# Altium PCB HSS_2026_PCB.PcbDoc (part 2 of 3)
Units mil, origin at the board's own origin, x right, y up, seen from the top; angles counter-clockwise.
Board outline 3937.01 x 3937.01 mil, 4 copper layers (SIG_1/POW, GND, PWR, SIG_2/GND), stack 22.334 mil thick; 289 components, 169 nets, 827 pads, 358 vias.
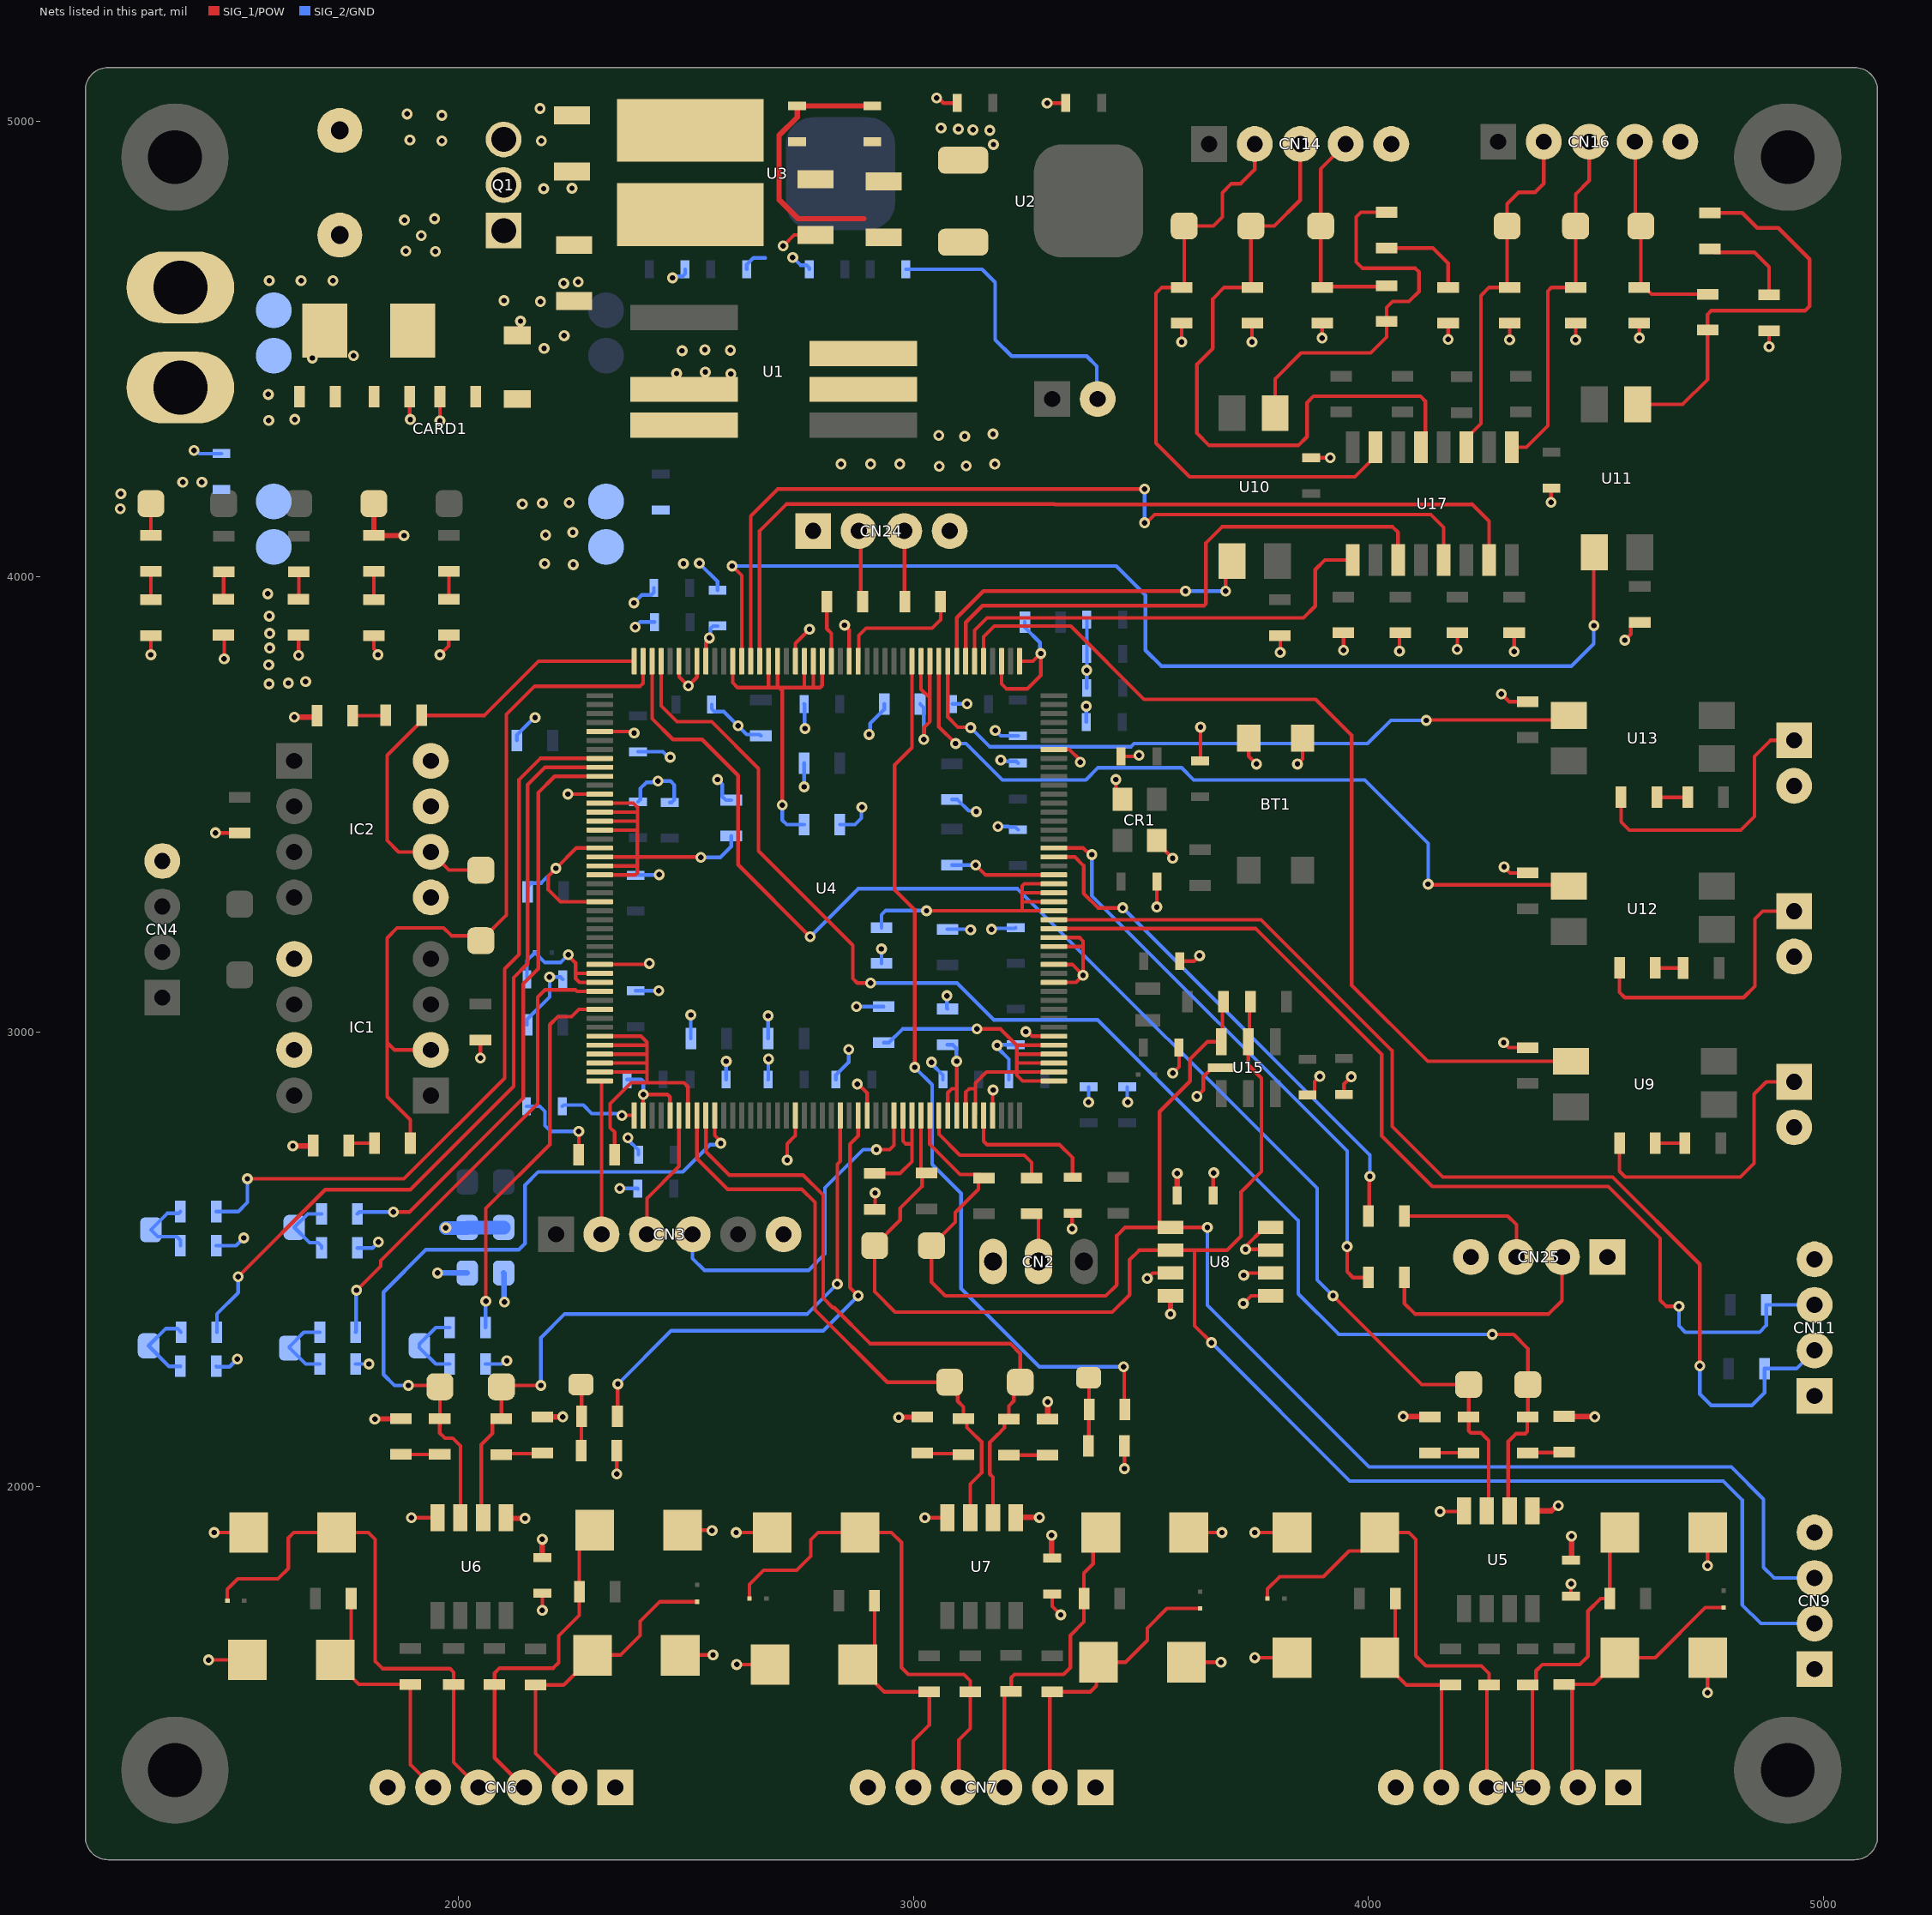
[diagram p4: the nets of this part, all layers, seen from the top]

## Via types
v1: diameter 24, hole 12, SIG_1/POW to SIG_2/GND, tented both sides, 358 vias

## Nets (pads, with @x,y where several pads share a name; then routed paths per layer and width w, separated by ;. In a path a pad name is that pad's centre, name@x,y a point inside that pad or via, vN(x,y) a via of type N, cw(c..) or ccw(c..) an arc to the next point about the centre after c; other vN are vias at no path point) (continued)
+5V_I: C4.1 C5.2 C6.2 C58.2 C59.2 C60.2 C61.2 CN5.1 CN6.1 CN7.1 CN9.1 CN11.1 CN24.1 CN25.1 D7.1 D8.1 D13.1 D14.1 D19.1 D20.1 D25.1 D26.1 IC2.8 P25.1 P26.1 R6.2 T4.1 U1.7 U2.1 U5.1 U6.1 U7.1 U8.8 | length 1663.7
  SIG_1/POW w12: v1(1637,2749) 1680.26,2749 D7.1@1681.26,2750 ; v1(1640,3691) 1686.31,3691 D8.1@1689.84,3694.53 ; T4.1@1815,4160 R6.2@1815,4090 v1(1881,4090) ; v1(1817,2149) 1817.58,2149.58 1873.95,2149.58 D20.1@1874.53,2150.16 ; U6.1@2105,1932.25 2106.25,1931 v1(2147,1931) ; C59.2@2185,1845 v1(2185,1885) ; D19.1@2185,2153.74 2185.13,2153.87 2229.87,2153.87 v1(2230,2154) ; 2891,4786 2747,4786 2705,4828 2705,4969 2745,5009 C5.2@2745,5033.74 C6.2@2910,5033.74 ; v1(2968,2153) 2968.37,2153.37 3019.63,2153.37 D26.1@3020,2153.74 ; U7.1@3225,1932.25 3225.75,1933 v1(3277,1933) ; D25.1@3295,2148.74 v1(3295,2187) ; v1(3304,1894) 3304,1844.74 C60.2@3305,1843.74 ; v1(3565,2380) U8.8@3565,2420 ; C61.2@3580,2640 v1(3580,2689) ; v1(4076,2155) 4076.63,2154.37 4134.37,2154.37 D14.1@4135,2153.74 ; U5.1@4360,1947.25 4402,1947.25 4413.75,1959 v1(4417,1959) ; D13.1@4429.53,2155.16 4430.11,2154.58 4496.42,2154.58 v1(4497,2154) ; C58.2@4445,1838.74 4446,1839.74 v1(4446,1892)
  SIG_2/GND w12: v1(1955,2470) P25.1@2020,2470 ; P26.1@2100,2470 2101,2469 2101,2407 v1(2102,2406)
  other v1: 3057,4242 3116,4243 3179,4247 3113,4308 3056,4310 3175,4313
+24V: C2.2 C15.2 CARD1.3 CARD1.4 I1.1 Q1.3 R3.2 T1.1 ZD1.2 | length 70
  SIG_1/POW w8: R3.2@1325,4090 T1.1@1325,4160
  other v1: 1258,4149 1259,4182 1395,4207 1437,4207 2189,4501 2233,4529 2137,4561 2181,4604 2101,4606 1964,4957 2183,4957 1894,4959 1964,5013 1888,5016 2180,5028
A4_GPIO1: U4.49 U9.1 | length 2071.5
  SIG_1/POW w8: U4.49@3154.49,3813.82 3154.49,3867.49 3178,3891 3346,3891 3507,3730 3884,3730 3963,3651 3963,3102 4130,2935 U9.1@4445,2935
A5_GPIO2: U4.50 U17.1 | length 1008.9
  SIG_1/POW w8: U4.50@3134.8,3813.82 3134.8,3881.8 3162,3909 3857,3909 3883,3935 3883,4015 3904,4036 U17.1@3965,4036
A6_GPIO3: U4.51 U17.3 | length 1266.2
  SIG_1/POW w8: U4.51@3115.12,3813.82 3115.29,3813.99 3115.29,3899.29 3152,3936 3638.31,3936 3643,3940.69 3643,4074 3678,4109 4053,4109 4065,4097 U17.3@4065,4036
A7_TIM14_CH1: U4.52 U10.1 | length 782.2
  SIG_1/POW w8: U4.52@3095.43,3813.82 3095.43,3909.43 3154,3968 v1(3598,3968) ; v1(3686,3968) 3686,4020 U10.1@3700,4034
  SIG_2/GND w8: v1(3598,3968) v1(3686,3968)
A13_DEBUG_JTMS-SWDIO: CN3.2 U4.132 | length 339.7
  SIG_1/POW w8: U4.132@2311.18,2891.77 2313.49,2891.77 2315,2890.26 CN3.2@2315,2555
A14_DEBUG_JTCK-SWCLK: CN3.3 U4.138 | length 290.3
  SIG_1/POW w8: CN3.3@2415,2555 2415,2634 2485.2,2704.2 U4.138@2485.2,2816.18
B2_SPI3_MOSI: R43.1 U4.57 | length 1977.5
  SIG_1/POW w8: U4.57@2997.01,3813.82 2997.01,3624.01 2959,3586 2959,3312 3003,3268 v1(3003,2922) ; v1(3462,2264) 3463.5,2262.5 3463.5,2171.5 R43.1@3465,2170
  SIG_2/GND w8: v1(3003,2922) 3041.16,2883.84 3041.16,2708.61 3105,2644.77 3105,2436 3277,2264 v1(3462,2264)
B3_DEBUG_JTDO-SWO: CN3.4 U4.162 | length 770.6
  SIG_1/POW w8: v1(2919,2741) 2948,2741 2957.64,2750.64 U4.162@2957.64,2816.18
  SIG_2/GND w8: CN3.4@2515,2555 2515,2502 2541,2476 2770,2476 2806,2512 2806,2657 2890,2741 v1(2919,2741)
B6_I2C1_SCL: CN9.2 R10.1 R73.1 T6.1 U4.165 U8.6 U15.5 | length 3863.2
  SIG_1/POW w8: U4.165@3016.69,2816.18 3016.69,2697.55 R10.1@3024.5,2689.74 ; R10.1@3025.62,2686.36 R10.1@3029,2689.74 3026.81,2689.74 3019,2681.93 3019,2660 2971,2612 2971,2586 T6.1@2915,2530 2915,2429 2960,2384 3437,2384 3475,2422 3475,2499 3496,2520 U8.6@3565,2520 3618,2520 ; v1(3655,2317) 3618,2354 3618,2520 ; R73.1@3741,3066 3738.5,3063.5 3738.5,2980.59 U15.5@3736,2978.09 3736,2927 3765,2898 3765,2693 3720,2648 3720,2551 3689,2520 3618,2520
  SIG_2/GND w8: v1(3655,2317) 3959,2013 4779.31,2013 4821,1971.31 4821,1741 4862,1700 CN9.2@4980,1700
B7_I2C1_SDA: CN9.3 R11.1 R74.1 T7.1 U4.166 U8.5 U15.6 | length 3652.9
  SIG_1/POW w8: U4.166@3036.38,2816.18 3036.38,2752.62 3102.45,2686.55 3147.19,2686.55 R11.1@3155,2678.74 3150.81,2678.74 3143,2670.93 3143,2654 3092,2603 3092,2582 T7.1@3040,2530 3040,2450 3070,2420 3423,2420 3447,2444 3447,2552 3465,2570 U8.5@3551.76,2570 ; v1(3646,2570) U8.5@3565,2570 U8.5@3551.76,2570 ; R74.1@3681,3066 3678.97,3063.97 3678.97,2980.11 U15.6@3676.94,2978.09 3646.09,2978.09 3608,2940 3608,2891.43 3541,2824.43 3541,2580.76 U8.5@3551.76,2570
  SIG_2/GND w8: v1(3646,2570) 3646,2399 4001,2044 4797,2044 4868,1973 4868,1823 4891,1800 CN9.3@4980,1800
B12_UART5_RX: R37.2 T10.1 U4.85 U5.2 | length 3217.6
  SIG_1/POW w8: U4.85@2445.83,3813.82 2445.83,3716.17 2481,3681 2557,3681 2660,3578 2660,3397 2867,3190 2867,3117 2877,3107 v1(2906,3107) ; v1(4272,2335) 4319,2335 4350,2304 T10.1@4350,2225 R37.2@4350,2153.74 4349,2152.74 4349,2121.69 4344.31,2117 4324,2117 4307,2100 4307,1950.25 U5.2@4310,1947.25
  SIG_2/GND w8: v1(2906,3107) 3096,3107 3177,3026 3405,3026 3846,2585 3846,2424 3935,2335 v1(4272,2335)
B13_UART5_TX: R38.2 T11.1 U4.86 U5.3 | length 3156.4
  SIG_1/POW w8: U4.86@2426.14,3813.82 2426.14,3687.86 2472,3642 2536,3642 2615,3563 2615,3367 v1(2773.5,3208.5) ; v1(3922,2420) 4117,2225 T11.1@4220,2225 R38.2@4220,2153.74 4220,2123.69 4224.69,2119 4247,2119 4264,2102 4264,1951.25 U5.3@4260,1947.25
  SIG_2/GND w8: v1(2773.5,3208.5) 2879,3314 3229,3314 3887,2656 3887,2455 v1(3922,2420)
B14_USART1_TX: IC1.2 R29.2 T8.1 U4.87 | length 1698.8
  SIG_1/POW w8: R29.2@1895,2755 1895,2806.46 1844,2857.46 1844,2976 ; IC1.2@1940,2960 1860,2960 1844,2976 ; U4.87@2406.46,3813.82 2406.28,3813.65 2406.28,3765.28 2400,3759 2168,3759 2106,3697 2106,3256 T8.1@2050,3200 2039.24,3210.76 1985.24,3210.76 1968,3228 1866,3228 1844,3206 1844,2976
B15_USART1_RX: IC2.6 R39.2 T13.1 U4.88 | length 1055.4
  SIG_1/POW w8: T13.1@2050,3355 1980,3355 IC2.6@1940,3395 1869,3395 1844,3420 1844,3607.19 1920,3683.19 R39.2@1920,3695 2058,3695 2176.82,3813.82 U4.88@2386.77,3813.82
BOOT0: R9.1 U4.167 | length 305.1
  SIG_1/POW w8: U4.167@3056.06,2816.18 3056.24,2816.01 3056.24,2774.76 3102,2729 3244,2729 3260,2713 R9.1@3260,2678.74
C4_GPIO4: U4.53 U13.1 | length 1542.3
  SIG_1/POW w8: U4.53@3075.75,3813.82 3075.75,3691.25 3098,3669 3125,3669 v1(3126,3668) ; v1(4127,3684) 4128,3685 4430,3685 U13.1@4440,3695
  SIG_2/GND w8: v1(3126,3668) 3167.84,3626.16 3478.39,3626.16 3485.23,3633 3998,3633 4049,3684 v1(4127,3684)
C5_GPIO5: U4.54 U12.1 | length 1748.1
  SIG_1/POW w8: U4.54@3056.06,3813.82 3056.06,3669.94 v1(3093,3633) ; v1(4131,3324) 4132.07,3322.93 4437.07,3322.93 U12.1@4440,3320
  SIG_2/GND w8: v1(3093,3633) 3116,3633 3196,3553 3379,3553 3406,3580 3589,3580 3616,3553 3992,3553 4131.33,3413.67 4131.33,3324.33 v1(4131,3324)
C6_TIM3_CH1: R130.1 U4.122 | length 1045.9
  SIG_1/POW w8: v1(1777,2432) 1830,2485 1830,2497 2175,2842 2175,3076 2191,3092 2257.54,3092 2260.92,3088.62 U4.122@2311.18,3088.62
  SIG_2/GND w8: R130.1@1775,2340 1776,2341 1776,2431 v1(1777,2432)
C8_TIM3_CH3: R128.1 U4.124 | length 847.8
  SIG_1/POW w8: v1(2061,2408) 2061,2612 2201.5,2752.5 2201.5,3015.5 2219,3033 2249.15,3033 2265.4,3049.25 U4.124@2311.18,3049.25
  SIG_2/GND w8: R128.1@2060,2350 2060.5,2350.5 2060.5,2407.5 v1(2061,2408)
C10_SPI3_SCK: R60.2 T17.1 U4.140 U7.3 | length 1329.3
  SIG_1/POW w8: U4.140@2524.57,2816.18 2524.57,2721.43 2592,2654 2755,2654 2784,2625 2784,2389 2943,2230 T17.1@3080,2230 3097.52,2212.48 3097.52,2188.47 3110,2175.99 R60.2@3110,2150 3117.82,2142.19 3117.82,2130.88 3137.7,2111 3138,2111 3150,2099 3150,2031.14 3125,2006.14 U7.3@3125,1932.25
C11_SPI3_MISO: R59.2 T16.1 U4.141 U7.2 | length 1479.3
  SIG_1/POW w8: U4.141@2544.25,2816.18 2544.25,2736.75 2596,2685 2758,2685 2802,2641 2802,2415 2823,2394 2826,2394 2905,2315 3213,2315 3235,2293 T16.1@3235,2230 3220.61,2215.61 3220.61,2188.47 3210,2177.86 R59.2@3210,2148.74 3207.73,2148.74 3199.92,2140.93 3199.92,2129.62 3184.3,2114 3184,2114 3168,2098 3168,2028.38 3175,2021.38 U7.2@3175,1932.25
C12_SPI6_SCK: R56.2 T15.1 U4.142 U6.3 | length 1650.9
  SIG_1/POW w8: v1(1891,2223) 1957,2223 T15.1@1960,2220 1960,2150.63 R56.2@1959.53,2150.16 1959.53,2118.47 1971,2107 1988,2107 2005,2090 U6.3@2005,1932.25 ; U4.142@2563.94,2816.18 2563.94,2772.39 2577,2759.33 v1(2577,2755)
  SIG_2/GND w8: v1(1891,2223) 1860,2223 1836,2247 1836,2428 1929,2521 2133,2521 2147,2535 2147,2663 2176,2692 2493.67,2692 2553.61,2751.94 2573.94,2751.94 v1(2577,2755)
D13_TIM4_CH2: R138.1 U4.96 | length 1650.8
  SIG_1/POW w8: v1(1537,2677) 1881,2677 2102,2898 2102,3138 2134,3170 2134,3554 2180.43,3600.43 U4.96@2311.18,3600.43
  SIG_2/GND w8: R138.1@1468.74,2605 1517,2605 1537,2625 v1(1537,2677)
D14_TIM4_CH3: R129.1 U4.97 | length 1769.3
  SIG_1/POW w8: v1(1517,2462) 1708,2653 1895,2653 2122,2880 2122,3119 2152.5,3149.5 2152.5,3542.5 2190.75,3580.75 U4.97@2311.18,3580.75
  SIG_2/GND w8: R129.1@1470,2340 1470,2380 1517,2427 v1(1517,2462)
D15_TIM4_CH4: R136.1 U4.98 | length 1304.3
  SIG_1/POW w8: v1(1858,2604) 1893,2604 2143,2854 2143,3105 2176,3138 2176,3525 2212.06,3561.06 U4.98@2311.18,3561.06
  SIG_2/GND w8: R136.1@1778.74,2600 1782.74,2604 v1(1858,2604)
E12_GPIO6: U4.74 U17.7 | length 2015.5
  SIG_1/POW w8: U4.74@2662.36,3813.82 2662.36,4100.36 2721,4159 3309.95,4159 3310.53,4158.42 4225.42,4158.42 4226.69,4159.69 4265,4121.37 U17.7@4265,4036
E13_GPIO7: U4.75 U17.5 | length 2030.8
  SIG_1/POW w8: U4.75@2642.68,3813.82 2642.68,4132.68 2702,4192 v1(3507.95,4192) ; v1(3508,4118) 3512.33,4118 3530.33,4136 4137,4136 4165,4108 U17.5@4165,4036
  SIG_2/GND w8: v1(3508,4118) v1(3507.95,4192)
E14_TIM1_CH4: U4.76 U11.1 | length 2494.6
  SIG_1/POW w8: v1(2602,4023) 2622.99,4002.01 U4.76@2622.99,3813.82 ; v1(4495,3892) 4495,4052 U11.1@4496,4053
  SIG_2/GND w8: v1(2602,4023) 3446,4023 3510,3959 3510,3838 3545,3803 4446,3803 4495,3852 v1(4495,3892)
F0_I2C2_SDA: CN11.3 R148.1 U4.18 | length 2299.4
  SIG_1/POW w8: U4.18@3308.82,3226.42 3752.58,3226.42 4029,2950 4029,2771 4140,2660 4527,2660 4641,2546 4641,2410 4654,2397 v1(4682,2397)
  SIG_2/GND w8: v1(4682,2397) 4682,2354 4696,2340 4859,2340 4873.74,2354.74 R148.1@4873.74,2400 CN11.3@4980,2400
F1_I2C2_SCL: CN11.2 R147.1 U4.19 | length 2458.3
  SIG_1/POW w8: U4.19@3308.82,3246.1 3763.9,3246.1 4052,2958 4052,2792 4163,2681 4536,2681 4728,2489 v1(4728,2266)
  SIG_2/GND w8: v1(4728,2266) 4728,2204 4752.69,2179.31 4842.31,2179.31 4870,2207 R147.1@4870,2260 4940,2260 CN11.2@4980,2300
F6_UART7_RX: R146.1 U4.26 | length 1136.6
  SIG_1/POW w8: U4.26@3308.82,3383.9 3355.1,3383.9 3374.1,3364.9 3374.1,3303.9 3406,3272 3459.9,3272 v1(3460,3272.1) ; R146.1@4000,2595 4001.5,2596.5 4001.5,2680.5 v1(4003,2682)
  SIG_2/GND w8: v1(3460,3272.1) 4003,2729.1 v1(4003,2682)
F7_UART7_TX: R143.1 U4.27 | length 1290
  SIG_1/POW w8: U4.27@3308.82,3403.58 3373.09,3403.58 3387.67,3389 v1(3392,3389) ; v1(3953,2528) 3953,2473 3966,2460 R143.1@4000,2460
  SIG_2/GND w8: v1(3392,3389) 3392,3299 3953,2738 v1(3953,2528)
G0_UART9_RX: R145.1 U4.63 | length 291.1
  SIG_1/POW w8: U4.63@2878.9,3813.82 2880.41,3815.33 2880.41,3870.41 2896.26,3886.26 3041.26,3886.26 3060,3905 R145.1@3060,3945
G1_UART9_TX: R142.1 U4.66 | length 135.3
  SIG_1/POW w8: R142.1@2810,3945 2810,3885 2819.84,3875.16 U4.66@2819.84,3813.82
G12_SPI6_MISO: R55.2 T14.1 U4.156 U6.2 | length 1580.6
  SIG_1/POW w8: U6.2@2055,1932.25 2051,1936.25 2051,2093 2075.38,2117.38 2075.38,2142.19 2083.19,2150 R55.2@2095,2150 T14.1@2095,2220 2098,2223 v1(2182,2223) ; v1(2833,2446) 2833,2709 2839.53,2715.53 U4.156@2839.53,2816.18
  SIG_2/GND w8: v1(2182,2223) 2182,2328 2234,2380 2767,2380 v1(2833,2446)
G14_SPI6_MOSI: R41.1 U4.158 | length 1090.8
  SIG_1/POW w8: R41.1@2350,2155 2350.5,2155.5 2350.5,2225.5 v1(2351,2226) ; U4.158@2878.9,2816.18 2878.9,2770.9 2861,2753 2861,2438 v1(2879,2420)
  SIG_2/GND w8: v1(2351,2226) 2468,2343 2802,2343 v1(2879,2420)
GND: C1.2 C2.1 C3.1 C9.2 C10.1 C11.1 C12.1 C13.1 C15.1 C16.1 C68.1 C69.1 CARD1.1 CARD1.2 CARD1.5 CARD1.6 CN1.2 CN4.4 CN8.2 CN10.2 CN12.2 CN13.2 CN14.5 CN16.5 D2.2 D3.2 D4.2 IC1.5 IC1.7 R1.1 R2.1 R40.1 R89.1 R90.1 R91.1 R94.2 R95.1 R96.1 R97.1 R100.2 U1.2 U3.2 | length 1608
  SIG_1/POW w8: v1(1325,3828) D2.2@1325,3870 ; v1(1467,3437) 1467.37,3436.63 1519.63,3436.63 R40.1@1520,3436.26 ; D3.2@1484.53,3871.42 1486,3869.94 v1(1486,3819) ; v1(1649.53,3826.53) D4.2@1649.53,3871.42 ; v1@1893,4343 1893.74,4343 R1.1@1893.74,4395 ; v1(1960,4342) R2.1@1960,4395 ; v1(2714,4726) 2738,4750 C9.2@2785,4750 ; v1(3589.45,4515.45) R89.1@3589.45,4556.26 ; v1(3744,4515) 3744,4555.26 R90.1@3745,4556.26 ; C69.1@3874,4261 v1(3916,4261) ; v1(3898,4524) 3898,4555.84 R91.1@3898.42,4556.26 ; v1(4175,4521) R94.2@4175,4556.26 ; v1(4310,4520) R95.1@4310,4556.26 ; v1(4401,4163) 4401,4193 C68.1@4402,4194 ; v1(4455,4520) R96.1@4455,4556.26 ; v1(4595,4524) R97.1@4595,4556.26 ; v1(4880,4505) R100.2@4880,4540
  SIG_2/GND w8: v1(1420,4277) 1424.33,4277 1431.33,4270 C15.1@1480,4270 ; v1(2471,4656) 2475.33,4656 2478.64,4659.31 2492.9,4659.31 2498.74,4665.16 C10.1@2498.74,4675 ; C11.1@2633.74,4675 2633.74,4684.84 2648.9,4700 2675,4700 ; v1(2735,4701) 2751.97,4684.03 2765.42,4684.03 2771.26,4678.19 C13.1@2771.26,4675 ; C12.1@2983.74,4675 3151,4675 3180,4646 3180,4520 3216,4484 3381,4484 3403,4462 3403,4392 CN8.2@3405,4390
  other v1: 1584.68,3764.04 1627,3766 1665,3769 1584,3806 1586,3843 1586,3875 1585,3913 1582,3962 2253,4026 2190,4028 2192,4091 2252,4097 2141,4159 2185,4161 2244,4162 1895,4345 2599,4445 2480,4446 2543,4449 2492,4496 2598,4497 2542,4498 2232,4644 2264,4647 2188,4852 2250,4853
GND_I: BT1.2 BT1.3 C4.2 C5.1 C6.1 C7.1 C8.1 C9.1 C18.1 C19.1 C20.1 C21.1 C22.1 C23.1 C24.1 C25.1 C26.1 C27.2 C28.1 C29.1 C30.1 C31.2 C32.1 C33.1 C34.1 C35.1 C36.1 C37.1 C38.1 C39.1 C40.1 C41.1 C42.1 C43.1 C44.1 C45.1 C46.1 C47.1 C48.1 C49.1 C50.1 C51.1 C52.1 C53.1 C54.1 C55.1 C58.1 C59.1 C60.1 C61.1 C64.1 C65.1 CN2.3 CN3.6 CN5.6 CN6.6 CN7.6 CN9.4 CN11.4 CN24.4 CN25.4 CR1.2 CR1.4 D5.2 D6.2 D9.1 D10.1 D11.1 D12.1 D15.1 D16.1 D17.1 D18.1 D21.1 D22.1 D23.1 D24.1 IC2.5 IC2.7 P15.1 P16.1 R12.1 R13.1 R14.1 R15.1 R16.1 R17.1 R18.1 R19.1 R20.1 R21.1 R22.1 R23.1 R24.1 R26.1 R27.1 R28.1 R32.1 R42.1 R46.1 R62.1 R63.1 R64.1 R65.1 R69.2 R71.2 R82.1 R84.1 R86.1 R88.1 R92.1 R98.1 R132.1 R133.1 R134.1 R139.1 R140.1 U1.6 U2.2 U4.6 U4.12 U4.14 U4.16 U4.17 U4.24 U4.38 U4.45 U4.47 U4.64 U4.70 U4.81 U4.83 U4.93 U4.100 U4.106 U4.112 U4.119 U4.134 U4.137 U4.151 U4.159 U4.173 U5.4 U6.4 U7.4 U8.1 U8.2 U8.3 U8.4 U8.7 U15.7 | length 8609.4
  SIG_1/POW w8: v1(1452,1620) D15.1@1537.09,1620 ; v1(1464,1900) D16.1@1540,1900 ; D5.2@1815,3870 1815,3841.33 1824,3832.33 v1(1824,3828) ; v1(1897.25,1932.25) U6.4@1955,1932.25 ; v1(1960,3828) 1979.53,3847.53 D6.2@1979.53,3871.42 ; v1(2049,2942) R32.1@2049,2982 ; v1(2185,1729) C59.1@2185,1766.26 ; v1(2241,3522) 2241.31,3521.69 U4.100@2311.18,3521.69 ; R15.1@2265,2730 v1(2265,2781) ; U4.119@2311.18,3147.68 2311.35,3147.85 2417.85,3147.85 v1(2420,3150) ; U4.112@2311.18,3285.47 2224.53,3285.47 2198,3312 2198,3342 v1(2215,3359) 2259.58,3403.58 U4.106@2311.18,3403.58 ; U4.93@2311.18,3659.49 2383.18,3659.49 v1(2386.67,3656) ; v1(2348.74,2028.26) R42.1@2348.74,2080 ; U4.134@2406.46,2816.18 2406.63,2816.35 2406.63,2861.47 v1(2407.16,2862) 2459.83,2862 2465.51,2856.31 U4.137@2465.51,2816.18 ; U4.83@2485.2,3813.82 2485.37,3813.65 2485.37,3779.66 2505.03,3760 v1(2506,3760) 2524.57,3778.57 U4.81@2524.57,3813.82 ; D18.1@2487.91,1630 2488.91,1631 v1(2560,1631) ; D17.1@2492.91,1905 2557,1905 v1(2558,1904) ; v1(2611,1900) D22.1@2690,1900 ; v1(2612,1610) D21.1@2685,1610 ; v1(2723,2718) 2723,2753.77 2741.1,2771.87 U4.151@2741.1,2816.18 ; U4.70@2741.1,3813.82 2741.1,3853.1 v1(2772,3884) ; v1(2849,3893) 2859.21,3882.79 U4.64@2859.21,3813.82 ; v1(2876.9,2885) 2879,2885 2898.58,2865.42 U4.159@2898.58,2816.18 ; R17.1@2915,2610 2916,2611 v1(2916,2646) ; v1(3025.25,1932.25) U7.4@3075,1932.25 ; v1(3051,5051) 3055.33,5051 3066.33,5040 C7.1@3096.26,5040 ; v1(3136.74,3366.26) 3158.47,3344.53 U4.24@3308.82,3344.53 ; U4.173@3174.17,2816.18 3174.35,2816.35 3174.35,2870.97 v1(3175.32,2871.95) ; U4.47@3193.86,3813.82 3193.86,3764.14 3205,3753 3250,3753 3280,3783 v1(3280,3831) 3262.82,3813.82 U4.45@3233.23,3813.82 ; v1(3247,3000) 3251.33,3000 3261.13,2990.2 U4.6@3308.82,2990.2 ; v1(3294,5040) C8.1@3335,5040 ; C60.1@3305,1765 3305,1738 v1(3324,1719) ; U4.12@3308.82,3108.31 3357.31,3108.31 v1(3373,3124) ; U4.14@3308.82,3147.68 3349.32,3147.68 v1(3373,3124) ; U4.16@3308.82,3187.05 3308.99,3186.87 3373,3186.87 ; U4.17@3308.82,3206.73 3365.27,3206.73 3373,3199 v1(3373,3124) ; U4.38@3308.82,3620.12 3308.99,3619.94 3342.97,3619.94 3367,3595.92 v1(3367,3592) ; v1(3349,2567) 3349,2600.26 C30.1@3350,2601.26 ; v1(3445,3554) 3445,3525.55 CR1.4@3460,3510.55 ; C26.1@3456.26,3605 3494,3605 v1(3496,3607) ; v1(3463.74,2040.26) R46.1@3463.74,2090 ; v1(3514,2458) 3526,2470 U8.7@3565,2470 ; CR1.2@3534.8,3420 3534.8,3416.06 v1(3569.87,3381) ; v1(3535,3274) C25.1@3535,3330 ; v1(3570,2909) 3583.74,2922.74 C27.2@3583.74,2965 ; C31.2@3585,3155 3617,3155 v1(3629,3167) ; D24.1@3600,1615 v1(3676,1615) ; D23.1@3605,1900 v1(3678,1900) ; v1(3623,2858) 3637.21,2872.21 3637.21,2900.95 3657.26,2921 U15.7@3676.94,2921 ; C18.1@3630,3595 3631,3596 v1(3631,3669) ; C61.1@3658.74,2640 3658.74,2688.74 v1(3660,2690) ; v1(3725,2403) 3742,2420 U8.1@3785,2420 ; v1(3726,2465) 3731,2470 U8.2@3785,2470 ; BT1.2@3736.89,3645 3736.89,3605.11 v1(3754,3588) ; v1(3750,1625) D9.1@3832.09,1625 ; v1(3750,1900) D10.1@3832.09,1900 ; U8.3@3785,2520 3783,2522 v1(3730,2522) 3730,2528.24 3771.76,2570 U8.4@3785,2570 ; R92.1@3805,3870.26 3806,3869.26 v1(3806,3833) ; v1(3844,3588) 3855,3599 BT1.3@3855,3645 ; C65.1@3866,2861 3875.84,2861 3881.69,2866.84 3881.69,2890.69 v1(3893,2902) ; v1(3945,3838) R82.1@3945,3876.26 ; C64.1@3946,2862.26 3946,2885 v1(3962,2901) ; v1(4068,3836) 4068,3874.26 R84.1@4070,3876.26 ; v1(4157,1946) 4208.75,1946 U5.4@4210,1947.25 ; v1(4195,3840) R86.1@4195,3876.26 ; v1(4292,3742) 4309,3725 R71.2@4350,3725 ; v1(4297,2976) 4308,2965 R62.1@4350,2965 ; v1(4298,3362) 4311.26,3348.74 R69.2@4350,3348.74 ; v1(4320,3835) R88.1@4320,3876.26 ; C58.1@4445,1760 v1(4445,1787) ; v1(4563,3860) 4576.38,3873.38 4576.38,3891.45 4584.19,3899.26 R98.1@4596,3899.26 ; v1(4745,1548) D12.1@4745,1625 ; v1(4745,1827) D11.1@4745,1900
  SIG_2/GND w8: R133.1@1468.74,2265 1469.74,2264 1498,2264 v1(1515,2281) ; R140.1@1468.74,2530 1512,2530 v1(1529,2547) ; R134.1@1775,2270 v1(1804,2270) ; R139.1@1778.74,2525 1812,2525 v1(1825,2538) ; R132.1@2060,2270 2095.67,2270 2102.67,2277 v1(2107,2277) ; R28.1@2129,3640 2129,3651.81 2167.19,3690 v1(2169,3690) ; C29.1@2150.26,2836 2179.67,2836 2191,2824.67 2191,2794 2204,2781 v1(2265,2781) ; R64.1@2151.26,3015 2151.26,3026.81 2201,3076.55 v1(2201,3120) 2225,3120 C19.1@2230,3115 ; R65.1@2153,3307 2153,3318.81 2160.81,3326.62 2182.62,3326.62 v1(2215,3359) ; v1(2355,2656) 2394,2656 C54.1@2395,2655 ; C44.1@2371.26,2895 2402.47,2895 2407.16,2890.31 v1(2407.16,2862) ; v1(2373.13,2766.85) 2373.13,2762.97 2396.26,2739.84 C47.1@2396.26,2730 ; v1(2386,3942) 2403.31,3959.31 2424.16,3959.31 2430,3965.16 C51.1@2430,3975 ; v1(2389,3889) 2400,3900 C50.1@2431.26,3900 ; C42.1@2390,3090 v1(2441,3090) ; C43.1@2390,3343.74 2390.63,3344.37 2441.37,3344.37 v1(2442,3345) ; C40.1@2395,3505 2400.16,3510.16 2400.16,3534.16 2413.77,3547.77 2435.94,3547.77 v1(2439,3550.84) 2466.16,3550.84 2475,3542 2475,3509.58 2469.16,3503.74 C41.1@2465,3503.74 ; C39.1@2395,3615 2449.67,3615 2461.67,3603 v1(2466,3603) ; R26.1@2511.26,2985 v1(2511.26,3036.74) ; v1(2530,4029) 2570,3989 C28.1@2570,3970 ; C38.1@2557,3719 2557,3709.16 2562.84,3703.31 2583.69,3703.31 v1(2615,3672) 2634.06,3652.94 2662.06,3652.94 R20.1@2665,3650 ; v1(2570,3554) 2580.38,3543.62 2580.38,3516.55 2588.19,3508.74 R13.1@2600,3508.74 ; C45.1@2588.74,2895 2588.87,2895.13 2588.87,2934.87 v1(2589,2935) ; v1(2681,3035) 2681.26,3034.74 R27.1@2681.26,2985 ; C46.1@2681.26,2895 2681.63,2895.37 2681.63,2939.63 v1(2682,2940) ; v1(2760,3538) R22.1@2760,3590 ; C37.1@2760,3720 2761,3719 2761,3667 v1(2762,3666) ; C52.1@2830,2895 2830,2904.84 2858,2932.84 v1(2858,2961) ; R14.1@2838.74,3455 2872,3455 2886,3469 2886,3492 v1(2887,3493) ; v1(2875,3055) R12.1@2935,3055 ; v1(2903,3653) 2905.07,3655.07 2905.07,3677 2936.26,3708.19 R16.1@2936.26,3720 ; R18.1@2930,3150 v1(2930,3182) ; v1(3040,2933) 3040,2929.84 3065,2904.84 C49.1@3065,2895 ; v1(3074,3079) 3074,3051 R19.1@3075,3050 ; R24.1@3075,3225 3125,3225 v1(3126,3224) ; R21.1@3085,3366.26 v1(3136.74,3366.26) ; R23.1@3085,3510 3096.81,3510 3121.75,3485.06 3136.94,3485.06 v1(3138.47,3483.53) ; C36.1@3086.26,3720 v1(3118,3720) ; v1(3172,3225) 3173.87,3226.87 3223.13,3226.87 C33.1@3225,3228.74 ; v1(3180,3662) 3192,3650 C35.1@3230,3650 ; v1(3186,3451) 3209.63,3451 3211.05,3449.58 3224.16,3449.58 C34.1@3230,3443.74 ; v1(3192,3597) 3195.06,3593.94 3226.06,3593.94 C24.1@3230,3590 ; C48.1@3210,2895 3210,2939.76 3184,2965.76 v1(3184,2970) 3185.26,2971.26 C32.1@3225,2971.26 ; R63.1@3245,3900 3245,3888.19 3278.19,3855 3278.19,3832.81 v1(3280,3831) ; C20.1@3380,3680 v1(3380,3715) ; C21.1@3381.26,3755 3381.13,3755.13 3381.13,3793.87 v1(3381,3794) 3381.26,3794.26 C22.1@3381.26,3830 C23.1@3381.26,3905 ; v1(3385,2845) C53.1@3385,2878.74 ; C55.1@3470,2878.74 3470,2846 v1(3471,2845)
  SIG_2/GND w30: v1(1973,2569) 2019,2569 P15.1@2020,2570 P16.1@2100,2570
  other v1: 2495,4028 2841,4247 2906,4247 2970,4247 3176,4949 3168,4980 3131.05,4981.14 3099,4983 3061,4985
Motor_1_I/O_1: CN14.2 R89.2 T20.1 U17.15 | length 1372.8
  SIG_1/POW w8: CN14.2@3750,4950 3750,4894 3719,4863 3699,4863 3679,4843 3679,4790 3659,4770 T20.1@3595,4770 3595,4640.55 R89.2@3589.45,4635 3546,4635 3533,4622 3533,4293 3607,4219 3970,4219 4015,4264 U17.15@4015,4284
Motor_1_I/O_2: CN14.3 R90.2 T21.1 U17.13 | length 1509.9
  SIG_1/POW w8: CN14.3@3850,4950 3850,4827 3793,4770 T21.1@3741.58,4770 3741.58,4638.42 R90.2@3745,4635 3683,4635 3658,4610 3658,4501 3623,4466 3623,4315 3650,4288 3846,4288 3865,4307 3865,4382 3879,4396 4114,4396 4125,4385 4125,4294 U17.13@4115,4284
Motor_1_PWM: CN14.4 R91.2 R93.2 T22.1 | length 482.3
  SIG_1/POW w8: CN14.4@3950,4950 3895,4895 T22.1@3895,4770 3895,4638.42 R91.2@3898.42,4635 3900.29,4636.87 4038.13,4636.87 R93.2@4040,4638.74
Motor_2_I/O_1: CN16.2 R95.2 T23.1 U17.11 | length 793.5
  SIG_1/POW w8: U17.11@4215,4284 4215,4304 4247,4336 4247,4617 4265,4635 R95.2@4310,4635 4304.45,4640.55 T23.1@4304.45,4770 4304.45,4818.45 4330,4844 4366,4844 4385,4863 CN16.2@4385,4955
Motor_2_I/O_2: CN16.3 R96.2 T24.1 U17.9 | length 791.2
  SIG_1/POW w8: U17.9@4315,4284 4347,4284 4394,4331 4394,4627 4402,4635 R96.2@4455,4635 T24.1@4455,4770 4455,4840 4485,4870 CN16.3@4485,4955
Motor_2_PWM: CN16.4 R97.2 R99.2 T25.1 | length 483.2
  SIG_1/POW w8: CN16.4@4585,4955 4586.33,4953.67 4586.33,4782.09 T25.1@4598.42,4770 4598.42,4638.42 R97.2@4595,4635 4606.81,4635 4621.81,4620 R99.2@4745,4620
NetC1_1: C1.1 CN1.1 F1.1
  other v1: 1680,4480 1770,4485 1585,4650 1655,4650 1725,4650
NetC3_2: C3.2 I1.2 U1.1
NetC19_2: C19.2 SB1.2 U4.120 U4.121 | length 324.1
  SIG_1/POW w8: v1(2242,3169) 2242,3167.06 2258,3151.06 2258,3128 ; U4.121@2311.18,3108.31 2266.69,3108.31 2258,3117 2258,3128 ; U4.120@2311.18,3127.99 2258.01,3127.99
  SIG_2/GND w8: C19.2@2151.26,3115 2151.26,3156.26 SB1.2@2169,3174 2191,3152 2225,3152 v1(2242,3169)
NetC28_2: C28.2 U4.80 | length 93.9
  SIG_1/POW w8: U4.80@2544.25,3813.82 2544.25,3857.25 v1(2552,3865)
  SIG_2/GND w8: v1(2552,3865) 2554.32,3867.32 2554.32,3885.42 2560.16,3891.26 C28.2@2570,3891.26
NetC29_2: C29.2 U4.133 | length 168.5
  SIG_1/POW w8: v1(2359.82,2816.18) U4.133@2386.77,2816.18
  SIG_2/GND w8: C29.2@2229,2836 2232,2839 2275,2839 2293.69,2820.31 2351.36,2820.31 2355.49,2816.18 v1(2359.82,2816.18)
NetC30_2: C30.2 U4.172 | length 310.3
  SIG_1/POW w8: U4.172@3154.49,2816.18 3154.49,2759.51 3162,2752 3321,2752 3350,2723 C30.2@3350,2680
NetCN2_2: CN2.2 R9.2 | length 115.4
  SIG_1/POW w8: R9.2@3260,2600 3267.19,2600 3275,2592.19 CN2.2@3275,2495
NetCN5_2: CN5.2 D12.2 R33.1 SB3.1 | length 655.9
  SIG_1/POW w8: R33.1@4430,1566.26 R33.1@4439.19,1566.26 ; CN5.2@4460,1340 4460,1352.65 4447,1365.65 4447,1558.45 R33.1@4439.19,1566.26 ; SB3.1@4780,1735 4739.8,1735 4629.8,1625 D12.2@4552.09,1625 4552.09,1623.03 4495.31,1566.26 R33.1@4439.19,1566.26
NetCN5_3: CN5.3 D11.2 R30.2 R34.1 | length 709.1
  SIG_1/POW w8: R34.1@4350,1565 4360.39,1565 4368.2,1572.81 4368.2,1596.2 4382,1610 4464,1610 4482,1628 4482,1727 4510,1755 R30.2@4530,1755 4530,1877.91 D11.2@4552.09,1900 ; R34.1@4357.91,1561.09 4356.09,1561.09 4360,1557.19 CN5.3@4360,1340
NetCN5_4: CN5.4 D10.2 R35.1 SB4.1 | length 1091
  SIG_1/POW w8: SB4.1@3778,1755 3778,1776 3805,1803 3901,1803 3957.51,1859.51 3986.48,1859.51 4025,1898.03 D10.2@4025,1900 4089,1900 4104,1885 4104,1629 4126,1607 4248,1607 4265,1590 R35.1@4265,1565 4260,1560 CN5.4@4260,1340
NetCN5_5: CN5.5 D9.2 R31.2 R36.1 | length 553.4
  SIG_1/POW w8: R31.2@4058.74,1755 4058.74,1658.74 D9.2@4025,1625 4025,1623.03 4083.03,1565 R36.1@4168.19,1565 ; CN5.5@4160,1340 4160.38,1340.38 4160.38,1557.19 R36.1@4168.19,1565 ; R36.1@4180,1565 R36.1@4168.19,1565
NetCN6_2: CN6.2 D18.2 R47.1 SB5.1 | length 706.2
  SIG_1/POW w8: CN6.2@2245,1340 2170,1415 R47.1@2170,1565 2231.97,1565 2295,1628.03 D18.2@2295,1630 2295.83,1630.83 2356.83,1630.83 2400,1674 2400,1705 2443,1748 SB5.1@2525,1748
NetCN6_3: CN6.3 D17.2 R44.2 R50.1 | length 752.2
  SIG_1/POW w8: CN6.3@2145,1340 2080,1405 R50.1@2080,1566.26 2080,1591 2091,1602 2209,1602 2221,1614 2221,1673 2266.26,1718.26 R44.2@2266.26,1770 2266.26,1871.26 D17.2@2300,1905
NetCN6_4: CN6.4 D16.2 R51.1 SB6.1 | length 1173
  SIG_1/POW w8: SB6.1@1493,1750 1493,1775 1516,1798 1604,1798 1627.2,1821.2 1627.2,1888.2 1639,1900 D16.2@1732.91,1900 1803,1900 1818,1885 1818,1617 1834,1601 1982,1601 1990,1593 R51.1@1990,1566.26 1990,1395 CN6.4@2045,1340
NetCN6_5: CN6.5 D15.2 R45.2 R53.1 | length 584.9
  SIG_1/POW w8: R45.2@1765,1755 1765,1655 D15.2@1730,1620 1730,1618.03 1781.77,1566.26 R53.1@1895,1566.26 1895,1390 CN6.5@1945,1340
NetCN7_2: CN7.2 D24.2 R52.1 SB7.1 | length 656.2
  SIG_1/POW w8: CN7.2@3300,1340 3300,1545 R52.1@3305,1550 3389,1550 3402.2,1563.2 3402.2,1610.11 D24.2@3407.09,1615 3466,1615 3514,1663 3514,1690 3557,1733 SB7.1@3630,1733
NetCN7_3: CN7.3 D23.2 R48.2 R54.1 | length 715.3
  SIG_1/POW w8: CN7.3@3200,1340 3200,1543.45 3207.81,1551.26 R54.1@3215,1551.26 3215,1581 3222,1588 3330,1588 3345,1603 3345,1674 3375,1704 R48.2@3375,1755 3375,1766.81 3375,1811 3395,1831 3395,1882.91 D23.2@3412.09,1900
NetCN7_4: CN7.4 D22.2 R57.1 SB8.1 | length 1124.8
  SIG_1/POW w8: SB8.1@2640,1755 2640,1786 2671,1817 2744,1817 2775,1848 2775,1884 2791,1900 D22.2@2882.91,1900 2952,1900 2974,1878 2974,1603 2989,1588 3111,1588 3125,1574 R57.1@3125,1550 3125,1469.2 3100,1444.2 CN7.4@3100,1340
NetCN7_5: CN7.5 D21.2 R49.2 R58.1 | length 563
  SIG_1/POW w8: R49.2@2915,1750 2915,1647.09 D21.2@2877.91,1610 2877.91,1608.03 2935.94,1550 R58.1@3035,1550 3035,1477 3000,1442 CN7.5@3000,1340
NetCN10_1: CN10.1 D27.2 | length 626.3
  SIG_1/POW w8: D27.2@4551.42,2755.47 4551.42,2693.58 4564,2681 4817,2681 4847,2711 4847,2863 4874,2890 CN10.1@4935,2890
NetCN12_1: CN12.1 D28.2 | length 607.7
  SIG_1/POW w8: D28.2@4551.42,3140.47 4551.42,3086.58 4563,3075 4824,3075 4848.81,3099.81 4848.81,3247.81 4866,3265 CN12.1@4935,3265
NetCN13_1: CN13.1 D32.2 | length 600.4
  SIG_1/POW w8: D32.2@4555,3515 4555,3461 4573,3443 4818,3443 4848,3473 4848,3605 4883,3640 CN13.1@4935,3640
NetCN24_2: CN24.2 R142.2 | length 158.6
  SIG_1/POW w8: CN24.2@2880,4100 2884.37,4095.63 2884.37,3949.37 R142.2@2888.74,3945
NetCN24_3: CN24.3 R145.2 | length 155.5
  SIG_1/POW w8: CN24.3@2980,4100 2980.63,4099.37 2980.63,3945.63 R145.2@2981.26,3945
NetCN25_2: CN25.2 R143.2 | length 520.6
  SIG_1/POW w8: R143.2@4078.74,2460 4078.74,2403.26 4102,2380 4396,2380 4425,2409 CN25.2@4425,2505
NetCN25_3: CN25.3 R146.2 | length 325.1
  SIG_1/POW w8: R146.2@4078.74,2595 4306,2595 4325,2576 CN25.3@4325,2505
NetD1_1: D1.1 R1.2
NetD1_2: D1.2 F1.2 Q1.2
  other v1: 1584,4343 1641,4345 1583,4400 1950,4714 1885,4715 1919,4749 1882,4783 1948,4786
NetD2_1: D2.1 R3.1 | length 62.5
  SIG_1/POW w8: D2.1@1325,3948.74 R3.1@1325,4011.26
NetD3_1: D3.1 R4.1 | length 60
  SIG_1/POW w8: D3.1@1484.53,3950.16 1485,3950.63 R4.1@1485,4010
NetD4_1: D4.1 R5.1 | length 60
  SIG_1/POW w8: D4.1@1649.53,3950.16 1650,3950.63 R5.1@1650,4010
NetD5_1: D5.1 R6.1 | length 62.5
  SIG_1/POW w8: D5.1@1815,3948.74 R6.1@1815,4011.26
NetD6_1: D6.1 R7.1 | length 61.3
  SIG_1/POW w8: D6.1@1979.53,3950.16 1980,3950.63 R7.1@1980,4011.26
NetD7_2: D7.2 R29.1 | length 58.3
  SIG_1/POW w8: D7.2@1760,2750 1765,2755 R29.1@1816.26,2755
NetD8_2: D8.2 R39.1 | length 72.9
  SIG_1/POW w8: D8.2@1768.58,3694.53 1840.79,3694.53 R39.1@1841.26,3695
NetD13_2: D13.2 R37.1 | length 80.1
  SIG_1/POW w8: R37.1@4350,2075 4350.71,2075.71 4428.82,2075.71 D13.2@4429.53,2076.42
NetD14_2: D14.2 R38.1 | length 85
  SIG_1/POW w8: D14.2@4135,2075 R38.1@4220,2075
NetD19_2: D19.2 R55.1 | length 91.5
  SIG_1/POW w8: R55.1@2095,2071.26 2096.87,2073.13 2183.13,2073.13 D19.2@2185,2075
NetD20_2: D20.2 R56.1 | length 85
  SIG_1/POW w8: D20.2@1874.53,2071.42 R56.1@1959.53,2071.42
NetD25_2: D25.2 R59.1 | length 85
  SIG_1/POW w8: R59.1@3210,2070 D25.2@3295,2070
NetD26_2: D26.2 R60.1 | length 91.5
  SIG_1/POW w8: D26.2@3020,2075 3021.87,2073.13 3108.13,2073.13 R60.1@3110,2071.26
NetD27_1: D27.1 R61.2 | length 65
  SIG_1/POW w8: D27.1@4630.16,2755.47 4630.63,2755 R61.2@4695,2755
NetD28_1: D28.1 R70.2 | length 61.3
  SIG_1/POW w8: D28.1@4630.16,3140.47 4630.63,3140 R70.2@4691.26,3140
NetD30_1: D30.1 R93.1 U10.3 | length 868.5
  SIG_1/POW w8: U10.3@3795,4359 3795,4434 3852,4491 4005,4491 4040,4526 R93.1@4040,4560 4040,4591 4053,4604 4089,4604 4111,4626 4111,4669 4103,4677 3987,4677 3973,4691 3973,4790 3983.16,4800.16 D30.1@4039.53,4800.16
NetD30_2: D30.2 R94.1 | length 202.3
  SIG_1/POW w8: D30.2@4039.53,4721.42 4141.58,4721.42 4175,4688 R94.1@4175,4635
NetD31_1: D31.1 R99.1 U11.3 | length 915.4
  SIG_1/POW w8: U11.3@4591,4378 4690,4378 4745,4433 R99.1@4745,4541.26 4745,4576 4753,4584 4959,4584 4969,4594 4969,4697 4900.19,4765.81 4854.19,4765.81 4821.26,4798.74 D31.1@4750,4798.74
NetD31_2: D31.2 R100.1 | length 207.8
  SIG_1/POW w8: D31.2@4750,4720 4757.81,4712.19 4847.81,4712.19 4880,4680 R100.1@4880,4618.74
NetD32_1: D32.1 R68.2 | length 67.5
  SIG_1/POW w8: D32.1@4633.74,3515 R68.2@4701.26,3515
NetP1_1: P1.1 R41.2 R42.2 | length 146
  SIG_1/POW w8: R42.2@2270,2080 2270.63,2080.63 2270.63,2154.37 R41.2@2271.26,2155 2271.26,2223.74 P1.1@2270,2225
NetP2_1: P2.1 R43.2 R46.2 | length 151
  SIG_1/POW w8: R46.2@3385,2090 3385.63,2090.63 3385.63,2169.37 R43.2@3386.26,2170 3386.26,2238.74 P2.1@3385,2240
NetP12_1: P12.1 R128.2 R132.2 | length 170.3
  SIG_2/GND w8: R132.2@1981.26,2270 1951.06,2270 1915,2306.06 P12.1@1915,2310 1915,2313.94 1951.06,2350 R128.2@1981.26,2350
NetP13_1: P13.1 R129.2 R133.2 | length 179.1
  SIG_2/GND w8: R133.2@1390,2265 1365,2265 P13.1@1320,2310 1358,2348 1383.45,2348 1391.26,2340.19 R129.2@1391.26,2340
NetP14_1: P14.1 R130.2 R134.2 | length 163.8
  SIG_2/GND w8: R134.2@1696.26,2270 1665,2270 P14.1@1630,2305 1630,2308.94 1661.06,2340 R130.2@1696.26,2340
NetP19_1: P19.1 R136.2 R139.2 | length 153.4
  SIG_2/GND w8: R139.2@1700,2525 1700,2529 1692.19,2536.81 1673.48,2536.81 1640.29,2570 P19.1@1640,2570 1670,2600 R136.2@1700,2600
NetP20_1: P20.1 R138.2 R140.2 | length 168
  SIG_2/GND w8: R140.2@1390,2530 1390,2541.81 1382.19,2549.62 1340.38,2549.62 P20.1@1325,2565 1361,2601 1386,2601 R138.2@1390,2605
NetQ1_1: Q1.1 R2.2 ZD1.1
NetR12_2: R12.2 U4.1 U4.2 U4.3 U4.4 U4.5 U4.170 U4.171 | length 1051.4
  SIG_1/POW w8: U4.170@3115.12,2816.18 3115.12,2867.12 3123,2875 3136.31,2875 ; U4.171@3134.8,2816.18 3136.31,2817.69 3136.31,2875 ; v1@3140,3005.31 v1@3143.06,3002.25 ; v1(3140,3006) 3191.67,3006 3227.15,2970.51 ; U4.1@3308.82,2891.77 3240.23,2891.77 3227.15,2904.85 3227.15,2911.46 ; U4.2@3308.82,2911.46 3227.15,2911.46 ; U4.3@3308.82,2931.14 3228.01,2931.14 3227.15,2932 ; U4.4@3308.82,2950.83 3227.58,2950.83 3227.15,2951.26 ; U4.5@3308.82,2970.51 3227.15,2970.51 ; 3136.31,2875 3136.31,2887.31 3160.46,2911.46 3227.15,2911.46 ; 3227.15,2911.46 3227.15,2932 ; 3227.15,2932 3227.15,2951.26 ; 3227.15,2951.26 3227.15,2970.51
  SIG_2/GND w8: R12.2@2935,2976.26 2946.81,2976.26 2976.55,3006 v1(3140,3006)
NetR13_2: R13.2 U4.101 U4.102 U4.103 U4.104 U4.107 U4.108 U4.109 | length 970
  SIG_1/POW w8: U4.109@2311.18,3344.53 2389.27,3344.53 2393.95,3349.21 2393.95,3364.21 2393.95,3383.9 ; U4.108@2311.18,3364.21 2391.71,3364.21 2393,3365.5 ; U4.104@2311.18,3442.95 2393.95,3442.95 ; U4.103@2311.18,3462.64 2392.64,3462.64 2394,3464 ; U4.102@2311.18,3482.32 2393.68,3482.32 2394,3482 ; U4.101@2311.18,3502.01 2384.99,3502.01 2394,3493 2394,3482 ; U4.107@2312.13,3382.95 U4.107@2311.18,3383.9 2393.95,3383.9 ; v1(2533,3383) 2532.1,3383.9 2393.95,3383.9 ; 2393.95,3383.9 2393.95,3442.95 ; 2393.95,3442.95 2394,3443 2394,3464 ; 2394,3464 2394,3482
  SIG_2/GND w8: v1(2533,3383) 2576,3383 2600,3407 R13.2@2600,3430
NetR14_2: R14.2 U4.67 U4.68 U4.69 U4.72 U4.73 U4.77 | length 888.5
  SIG_1/POW w8: U4.77@2603.31,3813.82 2603.31,3766.69 2614,3756 2683,3756 ; U4.73@2682.05,3813.82 2682.05,3756.95 2683,3756 ; U4.72@2701.73,3813.82 2701.73,3759.27 2705,3756 ; v1(2712,3498) 2712,3749 2705,3756 ; U4.69@2760.79,3813.82 2760.79,3756.21 2761,3756 ; U4.68@2780.47,3813.82 2780.47,3758.45 2778.03,3756 ; U4.67@2798.65,3789.87 2800.16,3791.39 U4.67@2800.16,3813.82 ; U4.67@2799.74,3794.55 2799.74,3760.69 2795.05,3756 2778.03,3756 ; 2683,3756 2705,3756 ; 2705,3756 2761,3756 ; 2761,3756 2778.03,3756
  SIG_2/GND w8: v1(2712,3498) 2712,3465 2722,3455 R14.2@2760,3455
NetR15_2: R15.2 U4.127 U4.128 U4.129 U4.130 U4.131 U4.139 | length 988.4
  SIG_1/POW w8: U4.131@2311.18,2911.46 2413.54,2911.46 2415,2910 ; U4.130@2311.18,2931.14 2414.14,2931.14 2415,2932 ; U4.129@2311.18,2950.83 2413.83,2950.83 2415,2952 ; U4.128@2311.18,2970.51 2413.49,2970.51 2415,2969 ; U4.127@2311.18,2990.2 2401.8,2990.2 2415,2977 2415,2969 ; R15.2@2343.74,2730 2343.74,2779.42 2333.82,2789.34 2333.82,2841.82 2380,2888 2415,2888 ; U4.139@2504.88,2816.18 2504.88,2879.12 2496,2888 2415,2888 ; 2415,2888 2415,2910 ; 2415,2910 2415,2932 ; 2415,2932 2415,2952 ; 2415,2952 2415,2969
NetR16_2: R16.2 U4.55 U4.56 | length 348
  SIG_1/POW w8: U4.56@3016.69,3813.82 3016.69,3752.31 3036.38,3732.62 ; v1(3023.01,3642) 3023.01,3668.01 3036.38,3681.38 3036.38,3732.62 ; U4.55@3036.38,3813.82 3036.38,3732.62
  SIG_2/GND w8: R16.2@3015,3720 3022.81,3712.19 3022.81,3695.89 3023.01,3695.69 v1(3023.01,3642)
NetR17_2: R17.2 U4.163 U4.164 | length 272.6
  SIG_1/POW w8: R17.2@2915,2688.74 2970.74,2688.74 2997.01,2715.01 2997.01,2754 ; U4.163@2977.32,2816.18 2977.32,2759.68 2983,2754 2997.01,2754 ; U4.164@2997.01,2816.18 2997.01,2754
NetR18_2: R18.2 U4.20 U4.21 U4.22 U4.23 | length 677.2
  SIG_1/POW w8: v1(3029,3265.79) 3239,3265.79 ; U4.20@3308.82,3265.79 3239,3265.79 ; U4.21@3308.82,3285.47 3239.42,3285.47 3239,3285.89 ; U4.22@3308.82,3305.16 3239.84,3305.16 3239,3306 ; U4.23@3308.82,3324.84 3243.69,3324.84 3239,3320.16 3239,3306 ; 3239,3265.79 3239,3285.89 ; 3239,3285.89 3239,3306
  SIG_2/GND w8: R18.2@2930,3228.74 2930,3257 2939,3266 3028.79,3266 v1(3029,3265.79)
NetR19_2: R19.2 U4.168 U4.169 | length 242.6
  SIG_1/POW w8: U4.168@3075.75,2816.18 3075.75,2865.75 3084.87,2874.87 3095.43,2874.87 ; v1@3095,2934 3095.43,2933.57 3095.43,2874.87 ; U4.169@3095.43,2816.18 3095.43,2874.87
  SIG_2/GND w8: R19.2@3075,2971.26 3086.81,2971.26 3094.62,2963.45 3094.62,2935.6 v1(3095.22,2935)